# Altium PCB Membrane_Board_Latest.PcbDoc (part 1 of 4)
Units mil, origin at the board's own origin, x right, y up, seen from the top; angles counter-clockwise.
Board outline 11929.13 x 4962.8 mil, 2 copper layers (Top Layer, Bottom Layer), stack 59 mil thick; 247 components, 169 nets, 1256 pads, 657 vias.
Unrouted connection lines stored in the file: 293.
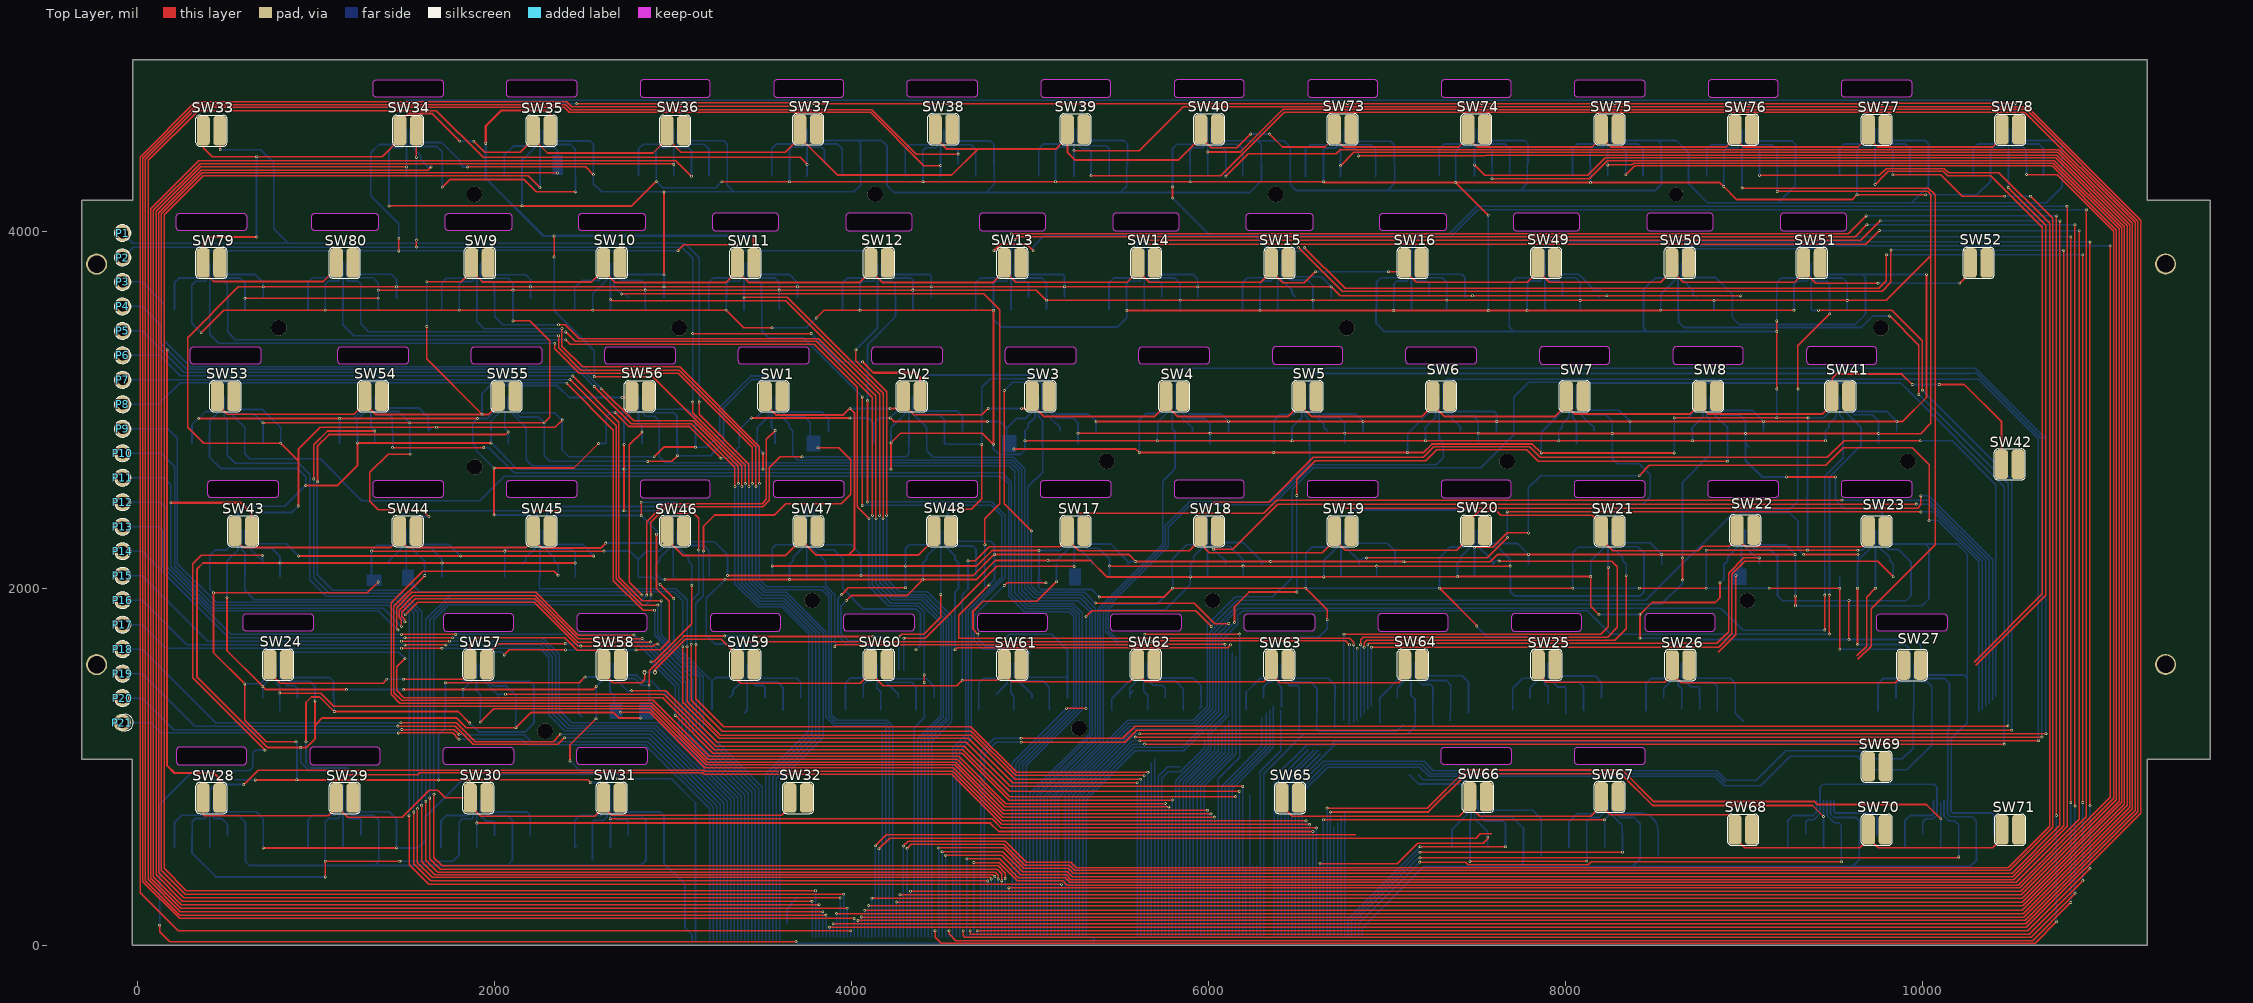
[diagram p0: Top Layer view]
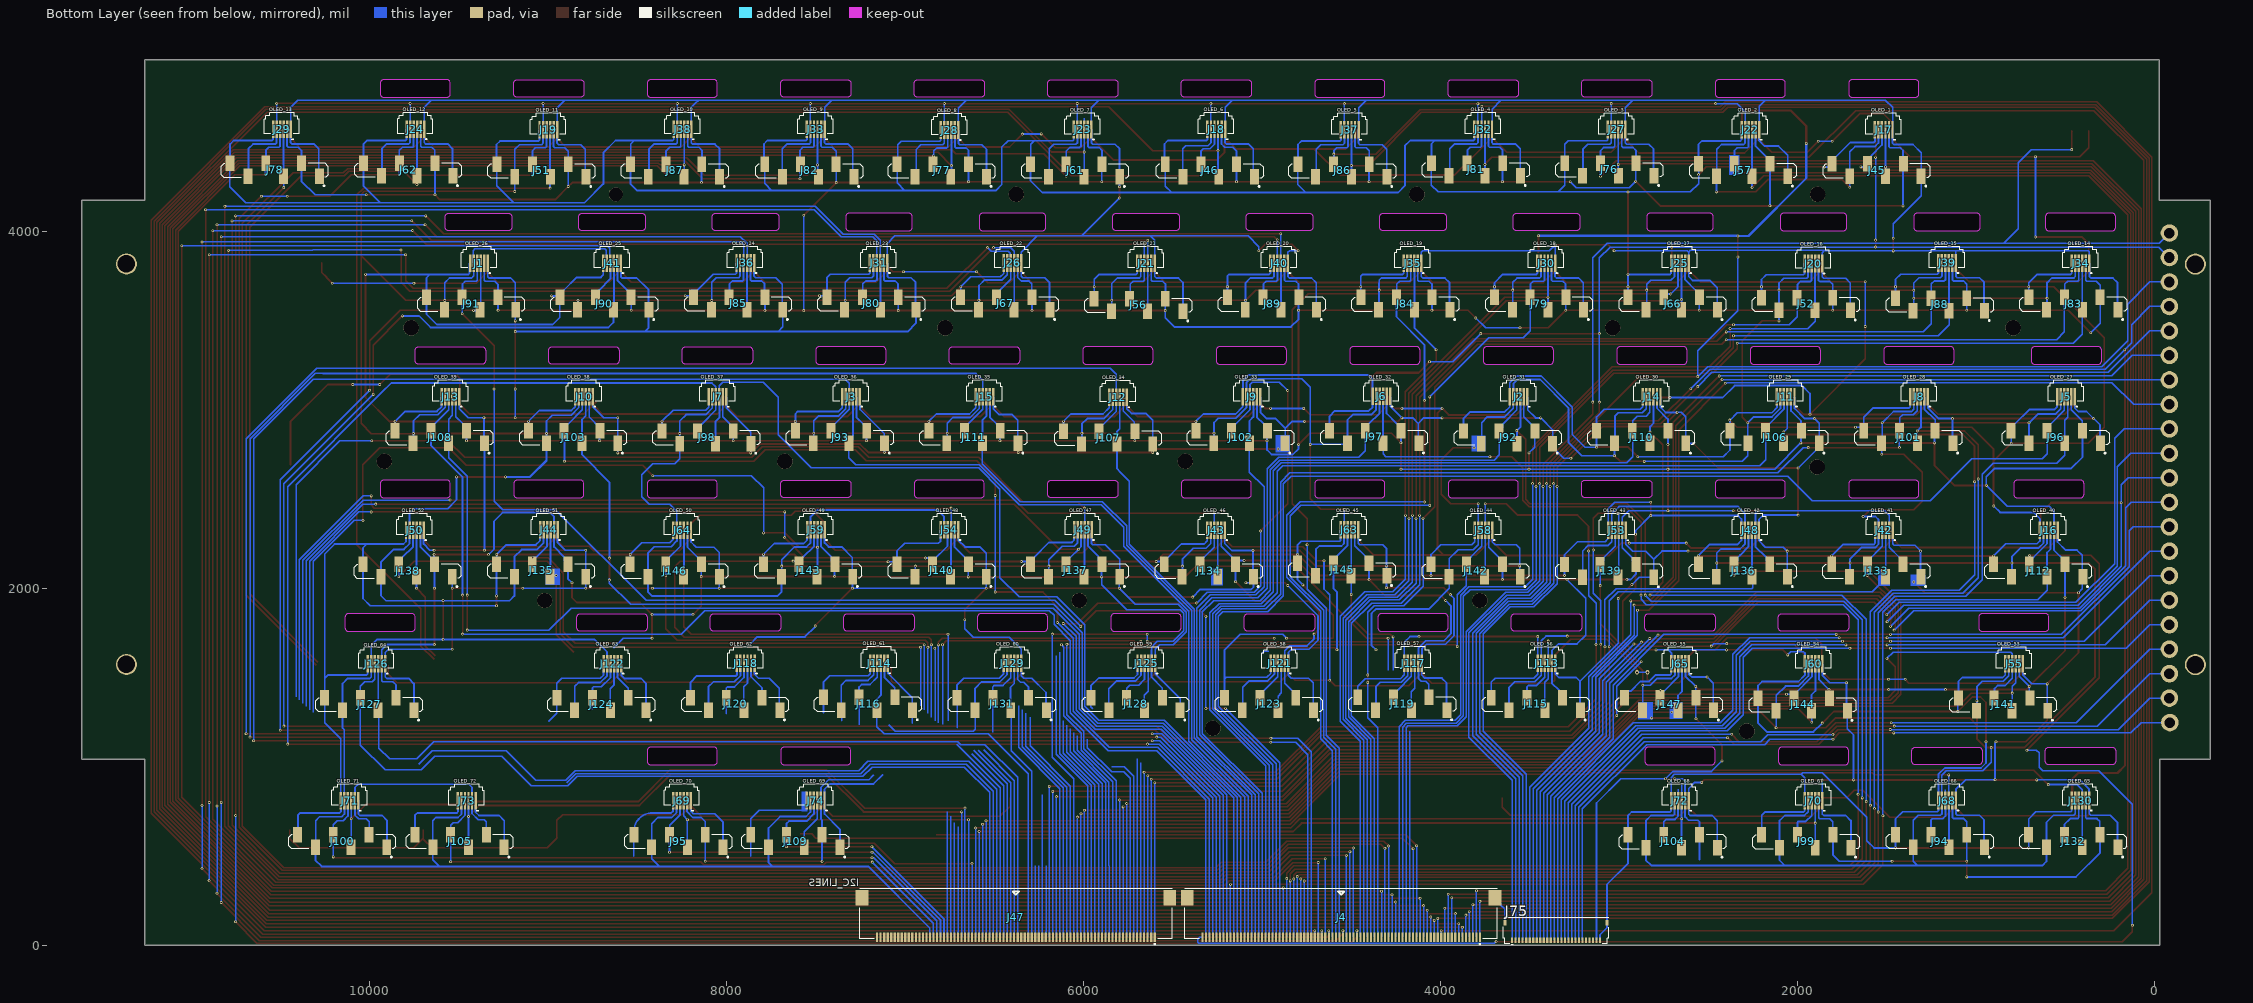
[diagram p1: Bottom Layer view, seen from below]
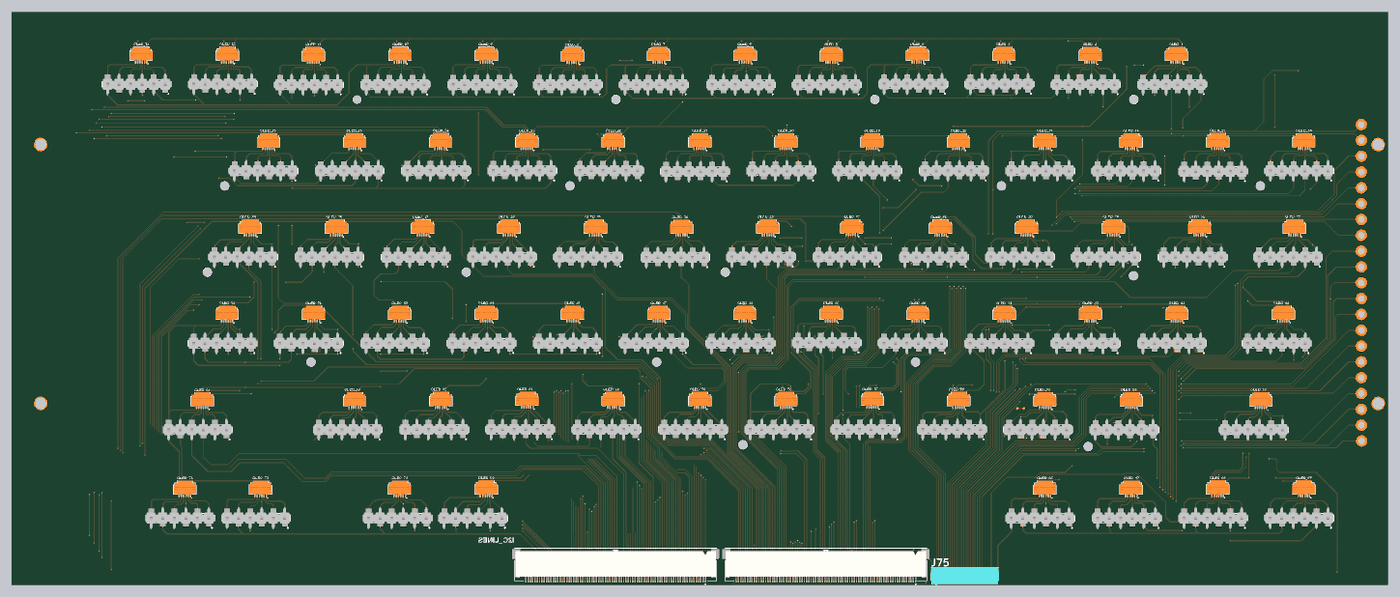
[diagram p5: 3D render of the assembled board from below, using the file's embedded part models]

## Layer stack, top to bottom
Top Solder: solder mask 2, Solder Resist, Dk 3.5
Top Layer: signal copper 12
Dielectric 1: dielectric 35, FR-4, Dk 4.8
Bottom Layer: signal copper 12
Bottom Solder: solder mask 2, Solder Resist, Dk 3.5

## Board outline
-314.96,1043.12 -314.96,4175.4 -29,4175.4 -29,4962.8 11260,4962.8 11260,4175.4 11614.17,4175.4 11614.17,1043.12 11260,1043.12 11260,0 -30,0 -30,1043.12
cut-out: 236.22,4003.16 cw(c236.22,4022.84) 216.54,4022.84 216.54,4081.9 cw(c236.22,4081.9) 236.22,4101.58 590.55,4101.58 cw(c590.55,4081.9) 610.24,4081.9 610.24,4022.84 cw(c590.55,4022.84) 590.55,4003.16
cut-out: 974.41,4022.84 974.41,4081.9 cw(c994.09,4081.9) 994.09,4101.58 1328.74,4101.58 cw(c1328.74,4081.9) 1348.43,4081.9 1348.43,4022.84 cw(c1328.74,4022.84) 1328.74,4003.16 994.09,4003.16 cw(c994.09,4022.84)
cut-out: 295.27,3274.81 295.27,3333.87 cw(c314.95,3333.87) 314.95,3353.55 669.28,3353.55 cw(c669.28,3333.87) 688.97,3333.87 688.97,3274.81 cw(c669.28,3274.81) 669.28,3255.13 314.95,3255.13 cw(c314.95,3274.81)
cut-out: 1122.05,3274.81 1122.05,3333.87 cw(c1141.73,3333.87) 1141.73,3353.55 1496.06,3353.55 cw(c1496.06,3333.87) 1515.75,3333.87 1515.75,3274.81 cw(c1496.06,3274.81) 1496.06,3255.13 1141.73,3255.13 cw(c1141.73,3274.81)
cut-out: 1318.9,2526.78 1318.9,2585.83 cw(c1338.58,2585.83) 1338.58,2605.52 1692.91,2605.52 cw(c1692.91,2585.83) 1712.6,2585.83 1712.6,2526.78 cw(c1692.91,2526.78) 1692.91,2507.09 1338.58,2507.09 cw(c1338.58,2526.78)
cut-out: 393.69,2526.78 393.69,2585.83 cw(c413.38,2585.83) 413.38,2605.52 767.71,2605.52 cw(c767.71,2585.83) 787.39,2585.83 787.39,2526.78 cw(c767.71,2526.78) 767.71,2507.09 413.38,2507.09 cw(c413.38,2526.78)
cut-out: 590.54,1778.75 590.54,1837.8 cw(c610.23,1837.8) 610.23,1857.49 964.56,1857.49 cw(c964.56,1837.8) 984.24,1837.8 984.24,1778.75 cw(c964.56,1778.75) 964.56,1759.06 610.23,1759.06 cw(c610.23,1778.75)
cut-out: 216.54,1030.72 ccw(c236.22,1030.72) 236.22,1011.03 590.55,1011.03 ccw(c590.55,1030.72) 610.24,1030.72 610.24,1089.77 ccw(c590.55,1089.77) 590.55,1109.46 236.22,1109.46 ccw(c236.22,1089.77) 216.54,1089.77
cut-out: 964.57,1030.72 ccw(c984.25,1030.72) 984.25,1011.03 1338.58,1011.03 ccw(c1338.58,1030.72) 1358.27,1030.72 1358.27,1089.77 ccw(c1338.58,1089.77) 1338.58,1109.46 984.25,1109.46 ccw(c984.25,1089.77) 964.57,1089.77
cut-out: 1712.6,1030.72 1712.6,1089.77 cw(c1732.28,1089.77) 1732.28,1109.46 2086.61,1109.46 cw(c2086.61,1089.77) 2106.3,1089.77 2106.3,1030.72 cw(c2086.61,1030.72) 2086.61,1011.03 1732.28,1011.03 cw(c1732.28,1030.72)
cut-out: 2460.63,1030.72 2460.63,1089.77 cw(c2480.31,1089.77) 2480.31,1109.46 2834.65,1109.46 cw(c2834.65,1089.77) 2854.33,1089.77 2854.33,1030.72 cw(c2834.65,1030.72) 2834.65,1011.03 2480.31,1011.03 cw(c2480.31,1030.72)
cut-out: 3966.54,4022.84 ccw(c3986.22,4022.84) 3986.22,4003.16 4320.87,4003.16 ccw(c4320.87,4022.84) 4340.55,4022.84 4340.55,4081.9 ccw(c4320.87,4081.9) 4320.87,4101.58 3986.22,4101.58 ccw(c3986.22,4081.9) 3966.54,4081.9
cut-out: 3218.5,4022.84 ccw(c3238.19,4022.84) 3238.19,4003.16 3572.83,4003.16 ccw(c3572.83,4022.84) 3592.52,4022.84 3592.52,4081.9 ccw(c3572.83,4081.9) 3572.83,4101.58 3238.19,4101.58 ccw(c3238.19,4081.9) 3218.5,4081.9
cut-out: 2470.47,4022.84 2470.47,4081.9 cw(c2490.16,4081.9) 2490.16,4101.58 2824.8,4101.58 cw(c2824.8,4081.9) 2844.49,4081.9 2844.49,4022.84 cw(c2824.8,4022.84) 2824.8,4003.16 2490.16,4003.16 cw(c2490.16,4022.84)
cut-out: 1722.44,4022.84 1722.44,4081.9 cw(c1742.13,4081.9) 1742.13,4101.58 2076.77,4101.58 cw(c2076.77,4081.9) 2096.46,4081.9 2096.46,4022.84 cw(c2076.77,4022.84) 2076.77,4003.16 1742.13,4003.16 cw(c1742.13,4022.84)
cut-out: 1870.08,3274.81 1870.08,3333.87 cw(c1889.76,3333.87) 1889.76,3353.55 2244.09,3353.55 cw(c2244.09,3333.87) 2263.78,3333.87 2263.78,3274.81 cw(c2244.09,3274.81) 2244.09,3255.13 1889.76,3255.13 cw(c1889.76,3274.81)
cut-out: 2618.11,3274.81 2618.11,3333.87 cw(c2637.8,3333.87) 2637.8,3353.55 2992.13,3353.55 cw(c2992.13,3333.87) 3011.81,3333.87 3011.81,3274.81 cw(c2992.13,3274.81) 2992.13,3255.13 2637.8,3255.13 cw(c2637.8,3274.81)
cut-out: 2066.93,2526.78 2066.93,2585.83 cw(c2086.61,2585.83) 2086.61,2605.52 2440.94,2605.52 cw(c2440.94,2585.83) 2460.63,2585.83 2460.63,2526.78 cw(c2440.94,2526.78) 2440.94,2507.09 2086.61,2507.09 cw(c2086.61,2526.78)
cut-out: 1712.6,1778.75 ccw(c1732.28,1778.75) 1732.28,1759.06 2086.61,1759.06 ccw(c2086.61,1778.75) 2106.3,1778.75 2106.3,1837.8 ccw(c2086.61,1837.8) 2086.61,1857.49 1732.28,1857.49 ccw(c1732.28,1837.8) 1712.6,1837.8
cut-out: 2460.63,1778.75 ccw(c2480.31,1778.75) 2480.31,1759.06 2834.65,1759.06 ccw(c2834.65,1778.75) 2854.33,1778.75 2854.33,1837.8 ccw(c2834.65,1837.8) 2834.65,1857.49 2480.31,1857.49 ccw(c2480.31,1837.8) 2460.63,1837.8
cut-out: 2814.96,2526.78 ccw(c2834.65,2526.78) 2834.65,2507.09 3188.98,2507.09 ccw(c3188.98,2526.78) 3208.66,2526.78 3208.66,2585.83 ccw(c3188.98,2585.83) 3188.98,2605.52 2834.65,2605.52 ccw(c2834.65,2585.83) 2814.96,2585.83
cut-out: 3208.66,1778.75 ccw(c3228.35,1778.75) 3228.35,1759.06 3582.68,1759.06 ccw(c3582.68,1778.75) 3602.36,1778.75 3602.36,1837.8 ccw(c3582.68,1837.8) 3582.68,1857.49 3228.35,1857.49 ccw(c3228.35,1837.8) 3208.66,1837.8
cut-out: 3956.69,1778.75 3956.69,1837.8 cw(c3976.38,1837.8) 3976.38,1857.49 4330.71,1857.49 cw(c4330.71,1837.8) 4350.39,1837.8 4350.39,1778.75 cw(c4330.71,1778.75) 4330.71,1759.06 3976.38,1759.06 cw(c3976.38,1778.75)
cut-out: 3562.99,2526.78 3562.99,2585.83 cw(c3582.68,2585.83) 3582.68,2605.52 3937.01,2605.52 cw(c3937.01,2585.83) 3956.69,2585.83 3956.69,2526.78 cw(c3937.01,2526.78) 3937.01,2507.09 3582.68,2507.09 cw(c3582.68,2526.78)
cut-out: 3366.14,3274.81 3366.14,3333.87 cw(c3385.83,3333.87) 3385.83,3353.55 3740.16,3353.55 cw(c3740.16,3333.87) 3759.84,3333.87 3759.84,3274.81 cw(c3740.16,3274.81) 3740.16,3255.13 3385.83,3255.13 cw(c3385.83,3274.81)
cut-out: 4114.17,3274.81 4114.17,3333.87 cw(c4133.86,3333.87) 4133.86,3353.55 4488.19,3353.55 cw(c4488.19,3333.87) 4507.87,3333.87 4507.87,3274.81 cw(c4488.19,3274.81) 4488.19,3255.13 4133.86,3255.13 cw(c4133.86,3274.81)
cut-out: 4311.02,2526.78 4311.02,2585.83 cw(c4330.71,2585.83) 4330.71,2605.52 4685.04,2605.52 cw(c4685.04,2585.83) 4704.72,2585.83 4704.72,2526.78 cw(c4685.04,2526.78) 4685.04,2507.09 4330.71,2507.09 cw(c4330.71,2526.78)
cut-out: 4714.57,4022.84 ccw(c4734.25,4022.84) 4734.25,4003.16 5068.9,4003.16 ccw(c5068.9,4022.84) 5088.58,4022.84 5088.58,4081.9 ccw(c5068.9,4081.9) 5068.9,4101.58 4734.25,4101.58 ccw(c4734.25,4081.9) 4714.57,4081.9
cut-out: 5462.6,4022.84 ccw(c5482.28,4022.84) 5482.28,4003.16 5816.93,4003.16 ccw(c5816.93,4022.84) 5836.61,4022.84 5836.61,4081.9 ccw(c5816.93,4081.9) 5816.93,4101.58 5482.28,4101.58 ccw(c5482.28,4081.9) 5462.6,4081.9
cut-out: 4862.2,3274.81 4862.2,3333.87 cw(c4881.89,3333.87) 4881.89,3353.55 5236.22,3353.55 cw(c5236.22,3333.87) 5255.91,3333.87 5255.91,3274.81 cw(c5236.22,3274.81) 5236.22,3255.13 4881.89,3255.13 cw(c4881.89,3274.81)
cut-out: 5610.24,3274.81 5610.24,3333.87 cw(c5629.92,3333.87) 5629.92,3353.55 5984.25,3353.55 cw(c5984.25,3333.87) 6003.94,3333.87 6003.94,3274.81 cw(c5984.25,3274.81) 5984.25,3255.13 5629.92,3255.13 cw(c5629.92,3274.81)
cut-out: 5059.06,2526.78 5059.06,2585.83 cw(c5078.74,2585.83) 5078.74,2605.52 5433.07,2605.52 cw(c5433.07,2585.83) 5452.76,2585.83 5452.76,2526.78 cw(c5433.07,2526.78) 5433.07,2507.09 5078.74,2507.09 cw(c5078.74,2526.78)
cut-out: 5807.09,2526.78 ccw(c5826.77,2526.78) 5826.77,2507.09 6181.1,2507.09 ccw(c6181.1,2526.78) 6200.79,2526.78 6200.79,2585.83 ccw(c6181.1,2585.83) 6181.1,2605.52 5826.77,2605.52 ccw(c5826.77,2585.83) 5807.09,2585.83
cut-out: 4704.72,1778.75 ccw(c4724.41,1778.75) 4724.41,1759.06 5078.74,1759.06 ccw(c5078.74,1778.75) 5098.43,1778.75 5098.43,1837.8 ccw(c5078.74,1837.8) 5078.74,1857.49 4724.41,1857.49 ccw(c4724.41,1837.8) 4704.72,1837.8
cut-out: 5452.76,1778.75 5452.76,1837.8 cw(c5472.44,1837.8) 5472.44,1857.49 5826.77,1857.49 cw(c5826.77,1837.8) 5846.46,1837.8 5846.46,1778.75 cw(c5826.77,1778.75) 5826.77,1759.06 5472.44,1759.06 cw(c5472.44,1778.75)
cut-out: 6200.79,1778.75 6200.79,1837.8 cw(c6220.47,1837.8) 6220.47,1857.49 6574.8,1857.49 cw(c6574.8,1837.8) 6594.49,1837.8 6594.49,1778.75 cw(c6574.8,1778.75) 6574.8,1759.06 6220.47,1759.06 cw(c6220.47,1778.75)
cut-out: 6210.63,4022.84 6210.63,4081.9 cw(c6230.31,4081.9) 6230.31,4101.58 6564.96,4101.58 cw(c6564.96,4081.9) 6584.65,4081.9 6584.65,4022.84 cw(c6564.96,4022.84) 6564.96,4003.16 6230.31,4003.16 cw(c6230.31,4022.84)
cut-out: 6958.66,4022.84 6958.66,4081.9 cw(c6978.35,4081.9) 6978.35,4101.58 7312.99,4101.58 cw(c7312.99,4081.9) 7332.68,4081.9 7332.68,4022.84 cw(c7312.99,4022.84) 7312.99,4003.16 6978.35,4003.16 cw(c6978.35,4022.84)
cut-out: 7106.3,3274.81 7106.3,3333.87 cw(c7125.98,3333.87) 7125.98,3353.55 7480.32,3353.55 cw(c7480.31,3333.87) 7500,3333.87 7500,3274.81 cw(c7480.32,3274.81) 7480.32,3255.13 7125.98,3255.13 cw(c7125.98,3274.81)
cut-out: 6358.27,3274.81 ccw(c6377.95,3274.81) 6377.95,3255.13 6732.28,3255.13 ccw(c6732.28,3274.81) 6751.97,3274.81 6751.97,3333.87 ccw(c6732.28,3333.87) 6732.28,3353.55 6377.95,3353.55 ccw(c6377.95,3333.87) 6358.27,3333.87
cut-out: 6555.12,2526.78 6555.12,2585.83 cw(c6574.8,2585.83) 6574.8,2605.52 6929.13,2605.52 cw(c6929.13,2585.83) 6948.82,2585.83 6948.82,2526.78 cw(c6929.13,2526.78) 6929.13,2507.09 6574.8,2507.09 cw(c6574.8,2526.78)
cut-out: 7303.15,2526.78 ccw(c7322.83,2526.78) 7322.83,2507.09 7677.17,2507.09 ccw(c7677.17,2526.78) 7696.85,2526.78 7696.85,2585.83 ccw(c7677.17,2585.83) 7677.17,2605.52 7322.83,2605.52 ccw(c7322.83,2585.83) 7303.15,2585.83
cut-out: 8051.18,2526.78 8051.18,2585.83 cw(c8070.87,2585.83) 8070.87,2605.52 8425.2,2605.52 cw(c8425.2,2585.83) 8444.88,2585.83 8444.88,2526.78 cw(c8425.2,2526.78) 8425.2,2507.09 8070.87,2507.09 cw(c8070.87,2526.78)
cut-out: 7854.33,3274.81 ccw(c7874.02,3274.81) 7874.02,3255.13 8228.35,3255.13 ccw(c8228.35,3274.81) 8248.03,3274.81 8248.03,3333.87 ccw(c8228.35,3333.87) 8228.35,3353.55 7874.02,3353.55 ccw(c7874.02,3333.87) 7854.33,3333.87
cut-out: 7706.69,4022.84 ccw(c7726.38,4022.84) 7726.38,4003.16 8061.02,4003.16 ccw(c8061.02,4022.84) 8080.71,4022.84 8080.71,4081.9 ccw(c8061.02,4081.9) 8061.02,4101.58 7726.38,4101.58 ccw(c7726.38,4081.9) 7706.69,4081.9
cut-out: 6948.82,1778.75 ccw(c6968.5,1778.75) 6968.5,1759.06 7322.83,1759.06 ccw(c7322.83,1778.75) 7342.52,1778.75 7342.52,1837.8 ccw(c7322.83,1837.8) 7322.83,1857.49 6968.5,1857.49 ccw(c6968.5,1837.8) 6948.82,1837.8
cut-out: 7696.85,1778.75 ccw(c7716.54,1778.75) 7716.54,1759.06 8070.87,1759.06 ccw(c8070.87,1778.75) 8090.55,1778.75 8090.55,1837.8 ccw(c8070.87,1837.8) 8070.87,1857.49 7716.54,1857.49 ccw(c7716.54,1837.8) 7696.85,1837.8
cut-out: 7303.15,1030.72 7303.15,1089.77 cw(c7322.83,1089.77) 7322.83,1109.46 7677.17,1109.46 cw(c7677.17,1089.77) 7696.85,1089.77 7696.85,1030.72 cw(c7677.17,1030.72) 7677.17,1011.03 7322.83,1011.03 cw(c7322.83,1030.72)
cut-out: 8051.18,1030.72 8051.18,1089.77 cw(c8070.87,1089.77) 8070.87,1109.46 8425.2,1109.46 cw(c8425.2,1089.77) 8444.88,1089.77 8444.88,1030.72 cw(c8425.2,1030.72) 8425.2,1011.03 8070.87,1011.03 cw(c8070.87,1030.72)
cut-out: 8444.88,1778.75 ccw(c8464.57,1778.75) 8464.57,1759.06 8818.9,1759.06 ccw(c8818.9,1778.75) 8838.58,1778.75 8838.58,1837.8 ccw(c8818.9,1837.8) 8818.9,1857.49 8464.57,1857.49 ccw(c8464.57,1837.8) 8444.88,1837.8
cut-out: 9744.09,1778.75 9744.09,1837.8 cw(c9763.77,1837.8) 9763.77,1857.49 10118.1,1857.49 cw(c10118.1,1837.8) 10137.79,1837.8 10137.79,1778.75 cw(c10118.1,1778.75) 10118.1,1759.06 9763.77,1759.06 cw(c9763.77,1778.75)
cut-out: 8799.21,2526.78 8799.21,2585.83 cw(c8818.9,2585.83) 8818.9,2605.52 9173.23,2605.52 cw(c9173.23,2585.83) 9192.91,2585.83 9192.91,2526.78 cw(c9173.23,2526.78) 9173.23,2507.09 8818.9,2507.09 cw(c8818.9,2526.78)
cut-out: 9547.24,2526.78 9547.24,2585.83 cw(c9566.93,2585.83) 9566.93,2605.52 9921.26,2605.52 cw(c9921.26,2585.83) 9940.94,2585.83 9940.94,2526.78 cw(c9921.26,2526.78) 9921.26,2507.09 9566.93,2507.09 cw(c9566.93,2526.78)
cut-out: 8602.36,3274.81 ccw(c8622.05,3274.81) 8622.05,3255.13 8976.38,3255.13 ccw(c8976.38,3274.81) 8996.06,3274.81 8996.06,3333.87 ccw(c8976.38,3333.87) 8976.38,3353.55 8622.05,3353.55 ccw(c8622.05,3333.87) 8602.36,3333.87
cut-out: 8454.72,4022.84 ccw(c8474.41,4022.84) 8474.41,4003.16 8809.06,4003.16 ccw(c8809.06,4022.84) 8828.74,4022.84 8828.74,4081.9 ccw(c8809.06,4081.9) 8809.06,4101.58 8474.41,4101.58 ccw(c8474.41,4081.9) 8454.72,4081.9
cut-out: 9350.39,3274.81 ccw(c9370.08,3274.81) 9370.08,3255.13 9724.41,3255.13 ccw(c9724.41,3274.81) 9744.09,3274.81 9744.09,3333.87 ccw(c9724.41,3333.87) 9724.41,3353.55 9370.08,3353.55 ccw(c9370.08,3333.87) 9350.39,3333.87
cut-out: 9202.76,4022.84 ccw(c9222.44,4022.84) 9222.44,4003.16 9557.09,4003.16 ccw(c9557.09,4022.84) 9576.77,4022.84 9576.77,4081.9 ccw(c9557.09,4081.9) 9557.09,4101.58 9222.44,4101.58 ccw(c9222.44,4081.9) 9202.76,4081.9
cut-out: 9547.24,4770.87 9547.24,4829.93 cw(c9566.93,4829.93) 9566.93,4849.61 9921.26,4849.61 cw(c9921.26,4829.93) 9940.94,4829.93 9940.94,4770.87 cw(c9921.26,4770.87) 9921.26,4751.19 9566.93,4751.19 cw(c9566.93,4770.87)
cut-out: 8799.21,4770.87 ccw(c8818.9,4770.87) 8818.9,4751.19 9173.23,4751.19 ccw(c9173.23,4770.87) 9192.91,4770.87 9192.91,4829.93 ccw(c9173.23,4829.93) 9173.23,4849.61 8818.9,4849.61 ccw(c8818.9,4829.93) 8799.21,4829.93
cut-out: 8051.18,4770.87 8051.18,4829.93 cw(c8070.87,4829.93) 8070.87,4849.61 8425.2,4849.61 cw(c8425.2,4829.93) 8444.88,4829.93 8444.88,4770.87 cw(c8425.2,4770.87) 8425.2,4751.19 8070.87,4751.19 cw(c8070.87,4770.87)
cut-out: 7303.15,4770.87 ccw(c7322.83,4770.87) 7322.83,4751.19 7677.17,4751.19 ccw(c7677.17,4770.87) 7696.85,4770.87 7696.85,4829.93 ccw(c7677.17,4829.93) 7677.17,4849.61 7322.83,4849.61 ccw(c7322.83,4829.93) 7303.15,4829.93
cut-out: 6555.12,4770.87 ccw(c6574.8,4770.87) 6574.8,4751.19 6929.13,4751.19 ccw(c6929.13,4770.87) 6948.82,4770.87 6948.82,4829.93 ccw(c6929.13,4829.93) 6929.13,4849.61 6574.8,4849.61 ccw(c6574.8,4829.93) 6555.12,4829.93
cut-out: 5826.77,4751.19 6181.1,4751.19 ccw(c6181.1,4770.87) 6200.79,4770.87 6200.79,4829.93 ccw(c6181.1,4829.93) 6181.1,4849.61 5826.77,4849.61 ccw(c5826.77,4829.93) 5807.09,4829.93 5807.09,4770.87 ccw(c5826.77,4770.87)
cut-out: 5826.77,4751.19 6181.1,4751.19 ccw(c6181.1,4770.87) 6200.79,4770.87 6200.79,4829.93 ccw(c6181.1,4829.93) 6181.1,4849.61 5826.77,4849.61 ccw(c5826.77,4829.93) 5807.09,4829.93 5807.09,4770.87 ccw(c5826.77,4770.87)
cut-out: 5078.74,4751.19 5433.07,4751.19 ccw(c5433.07,4770.87) 5452.76,4770.87 5452.76,4829.93 ccw(c5433.07,4829.93) 5433.07,4849.61 5078.74,4849.61 ccw(c5078.74,4829.93) 5059.06,4829.93 5059.06,4770.87 ccw(c5078.74,4770.87)
cut-out: 4311.02,4770.87 4311.02,4829.93 cw(c4330.71,4829.93) 4330.71,4849.61 4685.04,4849.61 cw(c4685.04,4829.93) 4704.72,4829.93 4704.72,4770.87 cw(c4685.04,4770.87) 4685.04,4751.19 4330.71,4751.19 cw(c4330.71,4770.87)
cut-out: 3582.68,4751.19 3937.01,4751.19 ccw(c3937.01,4770.87) 3956.69,4770.87 3956.69,4829.93 ccw(c3937.01,4829.93) 3937.01,4849.61 3582.68,4849.61 ccw(c3582.68,4829.93) 3562.99,4829.93 3562.99,4770.87 ccw(c3582.68,4770.87)
cut-out: 2834.65,4751.19 3188.98,4751.19 ccw(c3188.98,4770.87) 3208.66,4770.87 3208.66,4829.93 ccw(c3188.98,4829.93) 3188.98,4849.61 2834.65,4849.61 ccw(c2834.65,4829.93) 2814.96,4829.93 2814.96,4770.87 ccw(c2834.65,4770.87)
cut-out: 2066.93,4770.87 2066.93,4829.93 cw(c2086.61,4829.93) 2086.61,4849.61 2440.94,4849.61 cw(c2440.94,4829.93) 2460.63,4829.93 2460.63,4770.87 cw(c2440.94,4770.87) 2440.94,4751.19 2086.61,4751.19 cw(c2086.61,4770.87)
cut-out: 1338.58,4751.19 cw(c1338.58,4770.87) 1318.9,4770.87 1318.9,4829.93 cw(c1338.58,4829.93) 1338.58,4849.61 1692.91,4849.61 cw(c1692.91,4829.93) 1712.6,4829.93 1712.6,4770.87 cw(c1692.91,4770.87) 1692.91,4751.19

## Design rules (kind name [scope] priority, off if disabled: settings)
Clearance [All] p1: gap=7 ignorepadtopadclearanceinfootprint=FALSE except(4: Arc-SMDPad Track-SMDPad SMDPad-SMDPad)
ComponentClearance [All] p1: gap=0 collisioncheckmode=3 verticalgap=0 showdistances=FALSE
HoleSize [All] p1: absolutevalues=TRUE maxlimit=1000 minlimit=1 maxpercent=80.000 minpercent=20.000
HoleToHoleClearance [All] p1: gap=0 allowstackedmicrovias=TRUE
MinimumSolderMaskSliver [All] p1: minsoldermaskwidth=0
PolygonConnect [All] p1: connectstyle=Relief reliefconductorwidth=10 reliefentries=4 polygonreliefangle="90 Angle" airgapwidth=10
RoutingVias [All] p1: holewidth=11.81 width=23.62 viastyle="Through Hole" minholewidth=7.87 minwidth=15.75 maxholewidth=11.81 maxwidth=23.62
SilkToSilkClearance [All] p1: silktosilkclearance=0
SilkToSolderMaskClearance [IsPad] p1: minsilkscreentomaskgap=0 clearancetoexposedcopper=TRUE
SolderMaskExpansion [All] p1: expansion=4 istentingtop=FALSE
Width [All] p1: maxlimit=50 minlimit=8 preferedwidth=8 minimp=50.000000 maximp=50.000000 favimp=50.000000
24 further rules are at their usual default settings.

## Classes and differential pairs
component class U_Button_Sheet_2: SW41 SW42 SW43 SW44 SW45 SW46 SW47 SW48 SW49 SW50 SW51 SW52 SW53 SW54 SW55 SW56 SW57 SW58 SW59 SW60 SW61 SW62 SW63 SW64 SW65 SW66 SW67 SW68 SW69 SW70 SW71 SW73 SW74 SW75 SW76 SW77 SW78 SW79 SW80
component class U_Button_Sheet_1: SW1 SW2 SW3 SW4 SW5 SW6 SW7 SW8 SW9 SW10 SW11 SW12 SW13 SW14 SW15 SW16 SW17 SW18 SW19 SW20 SW21 SW22 SW23 SW24 SW25 SW26 SW27 SW28 SW29 SW30 SW31 SW32 SW33 SW34 SW35 SW36 SW37 SW38 SW39 SW40
component class U_Header_Sheet_4: J133 J134 J135 J136 J137 J138 J139 J140 J141 J142 J143 J144 J145 J146 J147
component class U_Header_Sheet_3: J113 J114 J115 J116 J117 J118 J119 J120 J121 J122 J123 J124 J125 J126 J127 J128 J129 J130 J131 J132 S
component class U_Header_Sheet_2: J91 J92 J93 J94 J95 J96 J97 J98 J99 J100 J101 J102 J103 J104 J105 J106 J107 J108 J109 J110 J111 J112
component class U_Header_Sheet_1: J45 J46 J51 J52 J56 J57 J61 J62 J66 J67 J76 J77 J78 J79 J80 J81 J82 J83 J84 J85 J86 J87 J88 J89 J90
component class U_Controller_Sheet_5: J75 P1 P2 P3 P4 P5 P6 P7 P8 P9 P10 P11 P12 P13 P14 P15 P16 P17 P18 P19 P20 P21
component class U_Connector_Sheet_4: J68 J69 J70 J71 J72 J73 J74
component class U_Connector_Sheet_3: J42 J43 J44 J47 J48 J49 J50 J53 J54 J55 J58 J59 J60 J63 J64 J65
component class U_Connector_Sheet_2: J17 J18 J19 J20 J21 J22 J23 J24 J25 J26 J27 J28 J29 J30 J31 J32 J33 J34 J35 J36 J37 J38 J39 J40 J41
component class U_Connector_Sheet_1: J1 J2 J3 J4 J5 J6 J7 J8 J9 J10 J11 J12 J13 J14 J15 J16

## Components (designator, comment, footprint, x,y, rotation, side; value= is the part's Value field where it differs from the comment)
J1 "FH19C-6S-0.5SH(10)" FH19C-6S-0.5SH(10) 9337.73,3821.75 r0 bottom locked
J2 "FH19C-6S-0.5SH(10)" FH19C-6S-0.5SH(10) 3512.73,3072.75 r0 bottom locked
J3 "FH19C-6S-0.5SH(10)" FH19C-6S-0.5SH(10) 7252.79,3073.75 r0 bottom
J4 "046288080000846+" 046288080000846+ 4556.35,155.68 r0 bottom locked
J5 "FH19C-6S-0.5SH(10)" FH19C-6S-0.5SH(10) 445.36,3073.75 r0 bottom locked
J6 "FH19C-6S-0.5SH(10)" FH19C-6S-0.5SH(10) 4281.73,3074.75 r0 bottom locked
J7 "FH19C-6S-0.5SH(10)" FH19C-6S-0.5SH(10) 8000.79,3072.75 r0 bottom locked
J8 "FH19C-6S-0.5SH(10)" FH19C-6S-0.5SH(10) 1268.42,3073.75 r0 bottom locked
J9 "FH19C-6S-0.5SH(10)" FH19C-6S-0.5SH(10) 5008.42,3073.75 r0 bottom
J10 "FH19C-6S-0.5SH(10)" FH19C-6S-0.5SH(10) 8749.1,3073.75 r0 bottom locked
J11 "FH19C-6S-0.5SH(10)" FH19C-6S-0.5SH(10) 2016.05,3073.75 r0 bottom locked
J12 "FH19C-6S-0.5SH(10)" FH19C-6S-0.5SH(10) 5757.42,3070.75 r0 bottom locked
J13 "FH19C-6S-0.5SH(10)" FH19C-6S-0.5SH(10) 9497.42,3073.75 r0 bottom locked
J14 "FH19C-6S-0.5SH(10)" FH19C-6S-0.5SH(10) 2766.73,3073.75 r0 bottom locked
J15 "FH19C-6S-0.5SH(10)" FH19C-6S-0.5SH(10) 6504.73,3073.75 r0 bottom locked
J16 "FH19C-6S-0.5SH(10)" FH19C-6S-0.5SH(10) 542.05,2325.75 r0 bottom locked
J17 "FH19C-6S-0.5SH(10)" FH19C-6S-0.5SH(10) 1466.79,4569.75 r0 bottom locked
J18 "FH19C-6S-0.5SH(10)" FH19C-6S-0.5SH(10) 5206.73,4571.75 r0 bottom locked
J19 "FH19C-6S-0.5SH(10)" FH19C-6S-0.5SH(10) 8949.42,4568.75 r0 bottom locked
J20 "FH19C-6S-0.5SH(10)" FH19C-6S-0.5SH(10) 1861.05,3819.75 r0 bottom locked
J21 "FH19C-6S-0.5SH(10)" FH19C-6S-0.5SH(10) 5600.05,3821.75 r0 bottom locked
J22 "FH19C-6S-0.5SH(10)" FH19C-6S-0.5SH(10) 2214.36,4569.75 r0 bottom locked
J23 "FH19C-6S-0.5SH(10)" FH19C-6S-0.5SH(10) 5955.42,4570.75 r0 bottom locked
J24 "FH19C-6S-0.5SH(10)" FH19C-6S-0.5SH(10) 9694.1,4572.75 r0 bottom locked
J25 "FH19C-6S-0.5SH(10)" FH19C-6S-0.5SH(10) 2609.05,3821.75 r0 bottom locked
J26 "FH19C-6S-0.5SH(10)" FH19C-6S-0.5SH(10) 6348.73,3822.75 r0 bottom locked
J27 "FH19C-6S-0.5SH(10)" FH19C-6S-0.5SH(10) 2963.79,4570.75 r0 bottom locked
J28 "FH19C-6S-0.5SH(10)" FH19C-6S-0.5SH(10) 6700.79,4567.75 r0 bottom locked
J29 "FH19C-6S-0.5SH(10)" FH19C-6S-0.5SH(10) 10442.42,4571.75 r0 bottom locked
J30 "FH19C-6S-0.5SH(10)" FH19C-6S-0.5SH(10) 3357.73,3821.75 r0 bottom locked
J31 "FH19C-6S-0.5SH(10)" FH19C-6S-0.5SH(10) 7098.42,3822.75 r0 bottom locked
J32 "FH19C-6S-0.5SH(10)" FH19C-6S-0.5SH(10) 3710.79,4571.75 r0 bottom locked
J33 "FH19C-6S-0.5SH(10)" FH19C-6S-0.5SH(10) 7450.79,4571.75 r0 bottom locked
J34 "FH19C-6S-0.5SH(10)" FH19C-6S-0.5SH(10) 363.73,3821.75 r0 bottom locked
J35 "FH19C-6S-0.5SH(10)" FH19C-6S-0.5SH(10) 4106.73,3821.75 r0 bottom locked
J36 "FH19C-6S-0.5SH(10)" FH19C-6S-0.5SH(10) 7845.73,3822.75 r0 bottom locked
J37 "FH19C-6S-0.5SH(10)" FH19C-6S-0.5SH(10) 4458.79,4568.75 r0 bottom locked
J38 "FH19C-6S-0.5SH(10)" FH19C-6S-0.5SH(10) 8197.05,4571.75 r0 bottom locked
J39 "FH19C-6S-0.5SH(10)" FH19C-6S-0.5SH(10) 1111.36,3822.75 r0 bottom locked
J40 "FH19C-6S-0.5SH(10)" FH19C-6S-0.5SH(10) 4854.1,3821.75 r0 bottom locked
J41 "FH19C-6S-0.5SH(10)" FH19C-6S-0.5SH(10) 8591.73,3821.75 r0 bottom locked
J42 "FH19C-6S-0.5SH(10)" FH19C-6S-0.5SH(10) 1465.73,2325.75 r0 bottom locked
J43 "FH19C-6S-0.5SH(10)" FH19C-6S-0.5SH(10) 5208.05,2325.75 r0 bottom locked
J44 "FH19C-6S-0.5SH(10)" FH19C-6S-0.5SH(10) 8946.36,2326.75 r0 bottom locked
J45 "X6511WVS-06H-C60D48R2" X6511WVS-06H-C60D48R2 1306.16,4307.38 r0 bottom locked
J46 "X6511WVS-06H-C60D48R2" X6511WVS-06H-C60D48R2 5041.79,4305.75 r0 bottom locked
J47 "046288080000846+" 046288080000846+ 6378.35,155.68 r0 bottom locked
J48 "FH19C-6S-0.5SH(10)" FH19C-6S-0.5SH(10) 2215.05,2325.75 r0 bottom locked
J49 "FH19C-6S-0.5SH(10)" FH19C-6S-0.5SH(10) 5954.42,2326.75 r0 bottom locked
J50 "FH19C-6S-0.5SH(10)" FH19C-6S-0.5SH(10) 9697.42,2325.75 r0 bottom locked
J51 "X6511WVS-06H-C60D48R2" X6511WVS-06H-C60D48R2 8786.79,4305.75 r0 bottom locked
J52 "X6511WVS-06H-C60D48R2" X6511WVS-06H-C60D48R2 1701.79,3557.75 r0 bottom locked
J53 "FH19C-6S-0.5SH(10)" FH19C-6S-0.5SH(10) 2961.42,2324.75 r0 bottom locked
J54 "FH19C-6S-0.5SH(10)" FH19C-6S-0.5SH(10) 6702.36,2326.75 r0 bottom locked
J55 "FH19C-6S-0.5SH(10)" FH19C-6S-0.5SH(10) 736.73,1576.75 r0 bottom locked
J56 "X6511WVS-06H-C60D48R2" X6511WVS-06H-C60D48R2 5441.79,3552.46 r0 bottom locked
J57 "X6511WVS-06H-C60D48R2" X6511WVS-06H-C60D48R2 2053.73,4307.38 r0 bottom locked
J58 "FH19C-6S-0.5SH(10)" FH19C-6S-0.5SH(10) 3709.42,2325.75 r0 bottom locked
J59 "FH19C-6S-0.5SH(10)" FH19C-6S-0.5SH(10) 7450.36,2326.75 r0 bottom locked
J60 "FH19C-6S-0.5SH(10)" FH19C-6S-0.5SH(10) 1859.42,1576.75 r0 bottom
J61 "X6511WVS-06H-C60D48R2" X6511WVS-06H-C60D48R2 5796.79,4305.75 r0 bottom locked
J62 "X6511WVS-06H-C60D48R2" X6511WVS-06H-C60D48R2 9533.47,4310.38 r0 bottom locked
J63 "FH19C-6S-0.5SH(10)" FH19C-6S-0.5SH(10) 4460.73,2326.75 r0 bottom locked
J64 "FH19C-6S-0.5SH(10)" FH19C-6S-0.5SH(10) 8199.05,2325.75 r0 bottom locked
J65 "FH19C-6S-0.5SH(10)" FH19C-6S-0.5SH(10) 2607.36,1576.75 r0 bottom
J66 "X6511WVS-06H-C60D48R2" X6511WVS-06H-C60D48R2 2448.42,3559.38 r0 bottom locked
J67 "X6511WVS-06H-C60D48R2" X6511WVS-06H-C60D48R2 6188.1,3560.38 r0 bottom locked
J68 "FH19C-6S-0.5SH(10)" FH19C-6S-0.5SH(10) 1111.36,810.75 r0 bottom locked
J69 "FH19C-6S-0.5SH(10)" FH19C-6S-0.5SH(10) 8201.05,809.75 r0 bottom locked
J70 "FH19C-6S-0.5SH(10)" FH19C-6S-0.5SH(10) 1860.42,809.75 r0 bottom locked
J71 "FH19C-6S-0.5SH(10)" FH19C-6S-0.5SH(10) 10062.79,809.75 r0 bottom locked
J72 "FH19C-6S-0.5SH(10)" FH19C-6S-0.5SH(10) 2609.05,809.75 r0 bottom locked
J73 "FH19C-6S-0.5SH(10)" FH19C-6S-0.5SH(10) 9406.42,809.75 r0 bottom locked
J74 "FH19C-6S-0.5SH(10)" FH19C-6S-0.5SH(10) 7451.1,810.75 r0 bottom locked
J75 "FH34SRJ-26S-0.5SH(50)" FH34SRJ-26S-0.5SH(50) 3351.95,77.67 r0 bottom locked
J76 "X6511WVS-06H-C60D48R2" X6511WVS-06H-C60D48R2 2803.16,4311.46 r0 bottom locked
J77 "X6511WVS-06H-C60D48R2" X6511WVS-06H-C60D48R2 6543.79,4305.75 r0 bottom locked
J78 "X6511WVS-06H-C60D48R2" X6511WVS-06H-C60D48R2 10281.79,4309.38 r0 bottom locked
J79 "X6511WVS-06H-C60D48R2" X6511WVS-06H-C60D48R2 3197.1,3559.38 r0 bottom locked
J80 "X6511WVS-06H-C60D48R2" X6511WVS-06H-C60D48R2 6937.79,3560.38 r0 bottom locked
J81 "X6511WVS-06H-C60D48R2" X6511WVS-06H-C60D48R2 3550.73,4311.46 r0 bottom locked
J82 "X6511WVS-06H-C60D48R2" X6511WVS-06H-C60D48R2 7285.79,4305.75 r0 bottom locked
J83 "X6511WVS-06H-C60D48R2" X6511WVS-06H-C60D48R2 203.1,3559.38 r0 bottom locked
J84 "X6511WVS-06H-C60D48R2" X6511WVS-06H-C60D48R2 3946.1,3559.38 r0 bottom locked
J85 "X6511WVS-06H-C60D48R2" X6511WVS-06H-C60D48R2 7685.1,3560.38 r0 bottom locked
J86 "X6511WVS-06H-C60D48R2" X6511WVS-06H-C60D48R2 4298.79,4305.75 r0 bottom locked
J87 "X6511WVS-06H-C60D48R2" X6511WVS-06H-C60D48R2 8038.79,4305.75 r0 bottom locked
J88 "X6511WVS-06H-C60D48R2" X6511WVS-06H-C60D48R2 950.79,3554.75 r0 bottom locked
J89 "X6511WVS-06H-C60D48R2" X6511WVS-06H-C60D48R2 4693.47,3559.38 r0 bottom locked
J90 "X6511WVS-06H-C60D48R2" X6511WVS-06H-C60D48R2 8434.1,3559.38 r0 bottom locked
J91 "X6511WVS-06H-C60D48R2" X6511WVS-06H-C60D48R2 9181.1,3559.38 r0 bottom locked
J92 "X6511WVS-06H-C60D48R2" X6511WVS-06H-C60D48R2 3371.1,2810.38 r0 bottom locked
J93 "X6511WVS-06H-C60D48R2" X6511WVS-06H-C60D48R2 7114.16,2811.38 r0 bottom locked
J94 "X6511WVS-06H-C60D48R2" X6511WVS-06H-C60D48R2 950.73,548.38 r0 bottom locked
J95 "X6511WVS-06H-C60D48R2" X6511WVS-06H-C60D48R2 8019.42,548.38 r0 bottom locked
J96 "X6511WVS-06H-C60D48R2" X6511WVS-06H-C60D48R2 301.73,2811.38 r0 bottom locked
J97 "X6511WVS-06H-C60D48R2" X6511WVS-06H-C60D48R2 4121.1,2812.38 r0 bottom locked
J98 "X6511WVS-06H-C60D48R2" X6511WVS-06H-C60D48R2 7862.16,2810.38 r0 bottom locked
J99 "X6511WVS-06H-C60D48R2" X6511WVS-06H-C60D48R2 1699.79,547.38 r0 bottom locked
J100 "X6511WVS-06H-C60D48R2" X6511WVS-06H-C60D48R2 9903.79,548.38 r0 bottom locked
J101 "X6511WVS-06H-C60D48R2" X6511WVS-06H-C60D48R2 1127.79,2811.38 r0 bottom locked
J102 "X6511WVS-06H-C60D48R2" X6511WVS-06H-C60D48R2 4869.79,2811.38 r0 bottom locked
J103 "X6511WVS-06H-C60D48R2" X6511WVS-06H-C60D48R2 8609.47,2811.38 r0 bottom locked
J104 "X6511WVS-06H-C60D48R2" X6511WVS-06H-C60D48R2 2448.42,547.38 r0 bottom locked
J105 "X6511WVS-06H-C60D48R2" X6511WVS-06H-C60D48R2 9245.79,548.38 r0 bottom locked
J106 "X6511WVS-06H-C60D48R2" X6511WVS-06H-C60D48R2 1877.42,2811.38 r0 bottom locked
J107 "X6511WVS-06H-C60D48R2" X6511WVS-06H-C60D48R2 5611.79,2808.38 r0 bottom locked
J108 "X6511WVS-06H-C60D48R2" X6511WVS-06H-C60D48R2 9356.79,2811.38 r0 bottom locked
J109 "X6511WVS-06H-C60D48R2" X6511WVS-06H-C60D48R2 7364.47,548.38 r0 bottom locked
J110 "X6511WVS-06H-C60D48R2" X6511WVS-06H-C60D48R2 2625.1,2811.38 r0 bottom locked
J111 "X6511WVS-06H-C60D48R2" X6511WVS-06H-C60D48R2 6366.1,2811.38 r0 bottom locked
J112 "X6511WVS-06H-C60D48R2" X6511WVS-06H-C60D48R2 400.42,2063.38 r0 bottom locked
J113 "FH19C-6S-0.5SH(10)" FH19C-6S-0.5SH(10) 3355.73,1578.75 r0 bottom
J114 "FH19C-6S-0.5SH(10)" FH19C-6S-0.5SH(10) 7095.73,1579.75 r0 bottom
J115 "X6511WVS-06H-C60D48R2" X6511WVS-06H-C60D48R2 3215.1,1316.38 r0 bottom locked
J116 "X6511WVS-06H-C60D48R2" X6511WVS-06H-C60D48R2 6957.1,1317.38 r0 bottom locked
J117 "FH19C-6S-0.5SH(10)" FH19C-6S-0.5SH(10) 4103.73,1579.75 r0 bottom
J118 "FH19C-6S-0.5SH(10)" FH19C-6S-0.5SH(10) 7843.1,1578.75 r0 bottom
J119 "X6511WVS-06H-C60D48R2" X6511WVS-06H-C60D48R2 3963.1,1317.38 r0 bottom locked
J120 "X6511WVS-06H-C60D48R2" X6511WVS-06H-C60D48R2 7701.47,1316.38 r0 bottom locked
J121 "FH19C-6S-0.5SH(10)" FH19C-6S-0.5SH(10) 4852.05,1578.75 r0 bottom
J122 "FH19C-6S-0.5SH(10)" FH19C-6S-0.5SH(10) 8590.42,1577.75 r0 bottom
J123 "X6511WVS-06H-C60D48R2" X6511WVS-06H-C60D48R2 4710.42,1316.38 r0 bottom locked
J124 "X6511WVS-06H-C60D48R2" X6511WVS-06H-C60D48R2 8450.79,1315.38 r0 bottom locked
J125 "FH19C-6S-0.5SH(10)" FH19C-6S-0.5SH(10) 5598.73,1578.75 r0 bottom
J126 "FH19C-6S-0.5SH(10)" FH19C-6S-0.5SH(10) 9912.36,1577.75 r0 bottom locked
J127 "X6511WVS-06H-C60D48R2" X6511WVS-06H-C60D48R2 9751.73,1315.38 r0 bottom locked
J128 "X6511WVS-06H-C60D48R2" X6511WVS-06H-C60D48R2 5458.1,1316.38 r0 bottom locked
J129 "FH19C-6S-0.5SH(10)" FH19C-6S-0.5SH(10) 6349.05,1578.75 r0 bottom
J130 "FH19C-6S-0.5SH(10)" FH19C-6S-0.5SH(10) 364.42,810.75 r0 bottom locked
J131 "X6511WVS-06H-C60D48R2" X6511WVS-06H-C60D48R2 6207.42,1316.38 r0 bottom locked
J132 "X6511WVS-06H-C60D48R2" X6511WVS-06H-C60D48R2 203.79,548.38 r0 bottom locked
J133 "X6511WVS-06H-C60D48R2" X6511WVS-06H-C60D48R2 1307.1,2063.38 r0 bottom locked
J134 "X6511WVS-06H-C60D48R2" X6511WVS-06H-C60D48R2 5047.42,2063.38 r0 bottom locked
J135 "X6511WVS-06H-C60D48R2" X6511WVS-06H-C60D48R2 8788.73,2064.38 r0 bottom locked
J136 "X6511WVS-06H-C60D48R2" X6511WVS-06H-C60D48R2 2054.42,2063.38 r0 bottom locked
J137 "X6511WVS-06H-C60D48R2" X6511WVS-06H-C60D48R2 5796.79,2064.38 r0 bottom locked
J138 "X6511WVS-06H-C60D48R2" X6511WVS-06H-C60D48R2 9536.79,2063.38 r0 bottom locked
J139 "X6511WVS-06H-C60D48R2" X6511WVS-06H-C60D48R2 2804.79,2062.38 r0 bottom locked
J140 "X6511WVS-06H-C60D48R2" X6511WVS-06H-C60D48R2 6544.73,2064.38 r0 bottom locked
J141 "X6511WVS-06H-C60D48R2" X6511WVS-06H-C60D48R2 597.1,1314.38 r0 bottom locked
J142 "X6511WVS-06H-C60D48R2" X6511WVS-06H-C60D48R2 3552.79,2063.38 r0 bottom locked
J143 "X6511WVS-06H-C60D48R2" X6511WVS-06H-C60D48R2 7292.73,2064.38 r0 bottom locked
J144 "X6511WVS-06H-C60D48R2" X6511WVS-06H-C60D48R2 1719.79,1313.75 r0 bottom locked
J145 "X6511WVS-06H-C60D48R2" X6511WVS-06H-C60D48R2 4299.79,2069.46 r0 bottom locked
J146 "X6511WVS-06H-C60D48R2" X6511WVS-06H-C60D48R2 8040.42,2063.38 r0 bottom locked
J147 "X6511WVS-06H-C60D48R2" X6511WVS-06H-C60D48R2 2468.73,1315.38 r0 bottom locked
P1 "Test Point" "TEST POINT"#1 -84.75,3990.46 r90 top locked
P2 "Test Point" "TEST POINT"#1 -84.75,3853.31 r90 top locked
P3 "Test Point" "TEST POINT"#1 -84.75,3716.16 r90 top locked
P4 "Test Point" "TEST POINT"#1 -84.75,3579.01 r90 top locked
P5 "Test Point" "TEST POINT"#1 -84.75,3441.86 r90 top locked
P6 "Test Point" "TEST POINT"#1 -84.75,3304.71 r90 top locked
P7 "Test Point" "TEST POINT"#1 -84.75,3167.56 r90 top locked
P8 "Test Point" "TEST POINT"#1 -84.75,3030.41 r90 top locked
P9 "Test Point" "TEST POINT"#1 -84.75,2893.26 r90 top locked
P10 "Test Point" "TEST POINT"#1 -84.75,2756.11 r90 top locked
P11 "Test Point" "TEST POINT"#1 -84.75,2618.96 r90 top locked
P12 "Test Point" "TEST POINT"#1 -84.75,2481.81 r90 top locked
P13 "Test Point" "TEST POINT"#1 -84.75,2344.66 r90 top locked
P14 "Test Point" "TEST POINT"#1 -84.75,2207.51 r90 top locked
P15 "Test Point" "TEST POINT"#1 -84.75,2070.36 r90 top locked
P16 "Test Point" "TEST POINT"#1 -84.75,1933.21 r90 top locked
P17 "Test Point" "TEST POINT"#1 -84.75,1796.06 r90 top locked
P18 "Test Point" "TEST POINT"#1 -84.75,1658.91 r90 top locked
P19 "Test Point" "TEST POINT"#1 -84.75,1521.76 r90 top locked
P20 "Test Point" "TEST POINT"#1 -84.75,1384.61 r90 top locked
P21 "Test Point" "TEST POINT"#2 -70.21,1247.46 r90 top locked
SW1 "Graphite Contact" "Graphite Contact" 3516.48,3076 r0 top
SW2 "Graphite Contact" "Graphite Contact" 4292,3076 r0 top
SW3 "Graphite Contact" "Graphite Contact" 5012.48,3076 r0 top
SW4 "Graphite Contact" "Graphite Contact" 5760.79,3076 r0 top
SW5 "Graphite Contact" "Graphite Contact" 6509.79,3076 r0 top
SW6 "Graphite Contact" "Graphite Contact" 7256.79,3076 r0 top
SW7 "Graphite Contact" "Graphite Contact" 8005.79,3076 r0 top
SW8 "Graphite Contact" "Graphite Contact" 8753.79,3076 r0 top
SW9 "Graphite Contact" "Graphite Contact" 1871.48,3823 r0 top
SW10 "Graphite Contact" "Graphite Contact" 2611,3823 r0 top
SW11 "Graphite Contact" "Graphite Contact" 3359.48,3823 r0 top
SW12 "Graphite Contact" "Graphite Contact" 4107.48,3823 r0 top
SW13 "Graphite Contact" "Graphite Contact" 4855.48,3823 r0 top
SW14 "Graphite Contact" "Graphite Contact" 5604,3823 r0 top
SW15 "Graphite Contact" "Graphite Contact" 6352,3823 r0 top
SW16 "Graphite Contact" "Graphite Contact" 7098.48,3823 r0 top
SW17 "Graphite Contact" "Graphite Contact" 5209.42,2320 r0 top
SW18 "Graphite Contact" "Graphite Contact" 5958,2320 r0 top
SW19 "Graphite Contact" "Graphite Contact" 6706,2320 r0 top
SW20 "Graphite Contact" "Graphite Contact" 7453.48,2323 r0 top
SW21 "Graphite Contact" "Graphite Contact" 8202.05,2320 r0 top
SW22 "Graphite Contact" "Graphite Contact" 8962.48,2326 r0 top
SW23 "Graphite Contact" "Graphite Contact" 9698.48,2320 r0 top
SW24 "Graphite Contact" "Graphite Contact" 741,1572 r0 top
SW25 "Graphite Contact" "Graphite Contact" 7847.48,1571 r0 top
SW26 "Graphite Contact" "Graphite Contact" 8598.48,1570 r0 top
SW27 "Graphite Contact" "Graphite Contact" 9896,1570 r0 top
SW28 "Graphite Contact" "Graphite Contact" 367,825 r0 top
SW29 "Graphite Contact" "Graphite Contact" 1113.48,825 r0 top
SW30 "Graphite Contact" "Graphite Contact" 1863.48,825 r0 top
SW31 "Graphite Contact" "Graphite Contact" 2610.48,825 r0 top
SW32 "Graphite Contact" "Graphite Contact" 3654.48,825 r0 top
SW33 "Graphite Contact" "Graphite Contact" 367.48,4564 r0 top
SW34 "Graphite Contact" "Graphite Contact" 1469.48,4564 r0 top
SW35 "Graphite Contact" "Graphite Contact" 2217.48,4564 r0 top
SW36 "Graphite Contact" "Graphite Contact" 2966,4564 r0 top
SW37 "Graphite Contact" "Graphite Contact" 3710.79,4571.75 r0 top
SW38 "Graphite Contact" "Graphite Contact" 4469,4571.75 r0 top
SW39 "Graphite Contact" "Graphite Contact" 5209,4571.75 r0 top
SW40 "Graphite Contact" "Graphite Contact" 5957,4571.75 r0 top
SW41 "Graphite Contact" "Graphite Contact" 9494.48,3076 r0 top
SW42 "Graphite Contact" "Graphite Contact" 10443.48,2694 r0 top locked
SW43 "Graphite Contact" "Graphite Contact" 545,2320 r0 top
SW44 "Graphite Contact" "Graphite Contact" 1468.1,2320 r0 top
SW45 "Graphite Contact" "Graphite Contact" 2218,2320 r0 top
SW46 "Graphite Contact" "Graphite Contact" 2965.79,2320 r0 top
SW47 "Graphite Contact" "Graphite Contact" 3712.79,2320 r0 top
SW48 "Graphite Contact" "Graphite Contact" 4461.79,2320 r0 top
SW49 "Graphite Contact" "Graphite Contact" 7845.48,3823 r0 top
SW50 "Graphite Contact" "Graphite Contact" 8595.48,3823 r0 top
SW51 "Graphite Contact" "Graphite Contact" 9335,3823 r0 top
SW52 "Graphite Contact" "Graphite Contact" 10268.48,3823 r0 top
SW53 "Graphite Contact" "Graphite Contact" 446,3076 r0 top
SW54 "Graphite Contact" "Graphite Contact" 1273,3076 r0 top
SW55 "Graphite Contact" "Graphite Contact" 2020.53,3076 r0 top
SW56 "Graphite Contact" "Graphite Contact" 2768.48,3076 r0 top
SW57 "Graphite Contact" "Graphite Contact" 1863,1572 r0 top
SW58 "Graphite Contact" "Graphite Contact" 2611.48,1572 r0 top
SW59 "Graphite Contact" "Graphite Contact" 3359.48,1572 r0 top
SW60 "Graphite Contact" "Graphite Contact" 4107,1572 r0 top
SW61 "Graphite Contact" "Graphite Contact" 4855.48,1572 r0 top
SW62 "Graphite Contact" "Graphite Contact" 5603,1572 r0 top
SW63 "Graphite Contact" "Graphite Contact" 6351.48,1572 r0 top
SW64 "Graphite Contact" "Graphite Contact" 7099.48,1572 r0 top
SW65 "Graphite Contact" "Graphite Contact" 6411.48,825 r0 top
SW66 "Graphite Contact" "Graphite Contact" 7464,831 r0 top
SW67 "Graphite Contact" "Graphite Contact" 8202,831 r0 top
SW68 "Graphite Contact" "Graphite Contact" 8950,647 r0 top
SW69 "Graphite Contact" "Graphite Contact" 9698,1001 r0 top
SW70 "Graphite Contact" "Graphite Contact" 9698,647 r0 top
SW71 "Graphite Contact" "Graphite Contact" 10446,647 r0 top
SW73 "Graphite Contact" "Graphite Contact" 6705.48,4571.75 r0 top
SW74 "Graphite Contact" "Graphite Contact" 7454,4571.75 r0 top
SW75 "Graphite Contact" "Graphite Contact" 8202.48,4571.75 r0 top
SW76 "Graphite Contact" "Graphite Contact" 8950.48,4569.75 r0 top
SW77 "Graphite Contact" "Graphite Contact" 9698,4569.75 r0 top
SW78 "Graphite Contact" "Graphite Contact" 10446.48,4569.75 r0 top
SW79 "Graphite Contact" "Graphite Contact" 367,3823 r0 top
SW80 "Graphite Contact" "Graphite Contact" 1114.48,3823 r0 top

## Footprints (in the part's own frame and the unit in brackets; to place one, negate y for a bottom-side part, rotate by r counter-clockwise, add the part's x,y. Pads: shape width x height; smd on the part's side, far side on the other; paste and mask are expansions set on the pad)
046288080000846+ [mm]
  rect 0.3x1.3 smd: 1(-19.75,2.825) 2(-19.25,2.825) 3(-18.75,2.825) 4(-18.25,2.825) 5(-17.75,2.825) 6(-17.25,2.825) 7(-16.75,2.825) 8(-16.25,2.825) 9(-15.75,2.825) 10(-15.25,2.825) 11(-14.75,2.825) 12(-14.25,2.825) 13(-13.75,2.825) 14(-13.25,2.825) 15(-12.75,2.825) 16(-12.25,2.825) 17(-11.75,2.825) 18(-11.25,2.825) 19(-10.75,2.825) 20(-10.25,2.825) 21(-9.75,2.825) 22(-9.25,2.825) 23(-8.75,2.825) 24(-8.25,2.825) 25(-7.75,2.825) 26(-7.25,2.825) 27(-6.75,2.825) 28(-6.25,2.825) 29(-5.75,2.825) 30(-5.25,2.825) 31(-4.75,2.825) 32(-4.25,2.825) 33(-3.75,2.825) 34(-3.25,2.825) 35(-2.75,2.825) 36(-2.25,2.825) 37(-1.75,2.825) 38(-1.25,2.825) 39(-0.75,2.825) 40(-0.25,2.825) 41(0.25,2.825) 42(0.75,2.825) 43(1.25,2.825) 44(1.75,2.825) 45(2.25,2.825) 46(2.75,2.825) 47(3.25,2.825) 48(3.75,2.825) 49(4.25,2.825) 50(4.75,2.825) 51(5.25,2.825) 52(5.75,2.825) 53(6.25,2.825) 54(6.75,2.825) 55(7.25,2.825) 56(7.75,2.825) 57(8.25,2.825) 58(8.75,2.825) 59(9.25,2.825) 60(9.75,2.825) 61(10.25,2.825) 62(10.75,2.825) 63(11.25,2.825) 64(11.75,2.825) 65(12.25,2.825) 66(12.75,2.825) 67(13.25,2.825) 68(13.75,2.825) 69(14.25,2.825) 70(14.75,2.825) 71(15.25,2.825) 72(15.75,2.825) 73(16.25,2.825) 74(16.75,2.825) 75(17.25,2.825) 76(17.75,2.825) 77(18.25,2.825) 78(18.75,2.825) 79(19.25,2.825) 80(19.75,2.825)
  rect 1.8x2.2 smd: MP1(-21.9,-2.825) MP2(21.9,-2.825)
  silkscreen extent -22.22,-4.11 22.23,3.84, body extent -22.1,-3.43 22.1,2.97, height 2.1
FH19C-6S-0.5SH(10) [mm] "Clamshell 0.5mm Bottom Contact Surface Mount 6 SMD,P=0.5mm FFC/FPC Connectors ROHS"
  rect 0.35x2.5 smd: 1(0,0) 2(0.5,0) 3(1,0) 4(1.5,0) 5(2,0) 6(2.5,0)
  silkscreen extent -1.24,-2.34 3.78,1.51, body extent -1.24,-2.38 3.76,1.11, height 0.9
FH34SRJ-26S-0.5SH(50) [mm] "CONN FFC FPC 26POS 0.50MM R/A"
  rect 0.3x0.8 smd: 1(6.25,1.25) 2(5.75,1.25) 3(5.25,1.25) 4(4.75,1.25) 5(4.25,1.25) 6(3.75,1.25) 7(3.25,1.25) 8(2.75,1.25) 9(2.25,1.25) 10(1.75,1.25) 11(1.25,1.25) 12(0.75,1.25) 13(0.25,1.25) 14(-0.25,1.25) 15(-0.75,1.25) 16(-1.25,1.25) 17(-1.75,1.25) 18(-2.25,1.25) 19(-2.75,1.25) 20(-3.25,1.25) 21(-3.75,1.25) 22(-4.25,1.25) 23(-4.75,1.25) 24(-5.25,1.25) 25(-5.75,1.25) 26(-6.25,1.25)
  rect 0.4x0.8 smd: MP1(-7.25,-1.25) MP2(7.25,-1.25)
  silkscreen extent -7.49,-1.91 7.49,1.94, body extent -7.5,-1.9 7.5,1.9, height 1
"Graphite Contact" [mm]
  rrect50% 1.85x4.2 smd: 1(0,0) 2(2.35,0)
  silkscreen extent -1.04,-2.21 3.39,2.21
"TEST POINT"#1 [mm]
  round 2.5 hole 1.5: 1(0,0)
  silkscreen extent -1.17,-1.17 1.17,1.16
"TEST POINT"#2 [mm]
  round 2.5 hole 1.5: 1(0,0.433)
  silkscreen extent -1.17,-1.17 1.17,1.16
X6511WVS-06H-C60D48R2 [mm] "250V 3A Brick nogging Square Pins 2.5mm 260? 6mm -40?~+105? 1 6 2.54mm Brass 1x6P SMD,P=2.54mm Pin Headers ROHS"
  rect 1.27x2.2 smd: 1(0,0) 2(2.54,-1.8) 3(5.08,0) 4(7.62,-1.8) 5(10.16,0) 6(12.7,-1.8)
  silkscreen extent -1.29,-1.8 13.97,1.45, body extent -1.24,-3.19 14,1.6

## Part data
J1 J2 J3 J5 J6 J7 J8 J9 J10 J11 J12 J13 J14 J15 J16 J17 J18 J19 J20 J21 J22 J23 J24 J25 J26 J27 J28 J29 J30 J31 J32 J33 J34 J35 J36 J37 J38 J39 J40 J41 J42 J43 J44 J48 J49 J50 J53 J54 J55 J58 J59 J60 J63 J64 J65 J68 J69 J70 J71 J72 J73 J74 J113 J114 J117 J118 J121 J122 J125 J126 J129 J130: "0.5mm Pitch, 0.9mm Height, No of Contact 4-50, FPC/FFC Connector, 0.5 A, -55 to 85 ℃, RoHS", Manufacturer=Hirose, Supplier Part Number 1=H125824CT-ND, Category="FFC / FPC", ComponentLink1Description=https://datasheet.ciiva.com/18563/ed-fh19cfh19sc-20140305-18563530.pdf?src-supplier=Digi-Key, ComponentLink1URL=https://datasheet.ciiva.com/18563/ed-fh19cfh19sc-20140305-18563530.pdf?src-supplier=Digi-Key, Manufacturer Part Number=FH19C-6S-0.5SH(10), Pricing 1="1=1.10000, 10=0.96900, 25=0.91200, 50=0.87400, 100=0.83600, 250=0.76000, 500=0.68400, 1000=0.60800, 2500=0.55100 (USD)", RoHS=Yes, Stock 1=1159, Supplier 1=Digi-Key
J4 J47: "0.5MM PITCH - 80 POS - RIGHT ANG", Manufacturer="Kyocera AVX", Package=Custom, ComponentLink1Description=LCSC, ComponentLink1URL=https://lcsc.com/product-detail/FFC-span-style-background-color-ff0-FPC-span-Connectors_Kyocera-046288080000846_C513346.html, Manufacturer Part No=046288080000846+
J45 J46 J51 J52 J56 J57 J61 J62 J66 J67 J76 J77 J78 J79 J80 J81 J82 J83 J84 J85 J86 J87 J88 J89 J90 J91 J92 J93 J94 J95 J96 J97 J98 J99 J100 J101 J102 J103 J104 J105 J106 J107 J108 J109 J110 J111 J112 J115 J116 J119 J120 J123 J124 J127 J128 J131 J132 J133 J134 J135 J136 J137 J138 J139 J140 J141 J142 J143 J144 J145 J146 J147: "6 POS 2.54mm SMD Header", Current Rating (Max)=3A, Manufacturer="XKB Connectivity", Voltage Rating (Max)=250V, Circluar Pins/Square Pins="Square Pins", ComponentLink1Description=LCSC, ComponentLink1URL=https://lcsc.com/product-detail/span-style-background-color-ff0-Pin-span-Headers_XKB-Connectivity-X6511WVS-06H-C60D48R2_C2883763.html, Insulation Height=2.5mm, Length of Mating Pin=6mm
J75: "CONN FFC FPC 26POS 0.50MM R/A", Manufacturer=Hirose, Manufacturer Part Number=FH34SRJ-8S-0.5SH(99), Supplier Part Number 1=1362475, Category="FFC / FPC", ComponentLink1Description=https://datasheet.ciiva.com/18561/ed-fh34s-20140305-18561974.pdf?src-supplier=Digi-Key, ComponentLink1URL=https://datasheet.ciiva.com/18561/ed-fh34s-20140305-18561974.pdf?src-supplier=Digi-Key, Pricing 1="5=2.79500, 25=2.28400, 100=2.17100, 250=1.96400 (USD)", RoHS=Yes, Stock 1=190, Supplier 1=RSComponents
P1 P2 P3 P4 P5 P6 P7 P8 P9 P10 P11 P12 P13 P14 P15 P16 P17 P18 P19 P20 P21: library part "TEST POINT", "Test Point ON"
SW1 SW2 SW3 SW4 SW5 SW6 SW7 SW8 SW9 SW10 SW11 SW12 SW13 SW14 SW15 SW16 SW17 SW18 SW19 SW20 SW21 SW22 SW23 SW24 SW25 SW26 SW27 SW28 SW29 SW30 SW31 SW32 SW33 SW34 SW35 SW36 SW37 SW38 SW39 SW40 SW41 SW42 SW43 SW44 SW45 SW46 SW47 SW48 SW49 SW50 SW51 SW52 SW53 SW54 SW55 SW56 SW57 SW58 SW59 SW60 SW61 SW62 SW63 SW64 SW65 SW66 SW67 SW68 SW69 SW70 SW71 SW73 SW74 SW75 SW76 SW77 SW78 SW79 SW80: "Push Button for Graphite Contact"

## Free pads (board coordinates)
  round 86.61 hole 86.61 unplated: MH(790.73,3459.03) MH(1886.8,4207.06) MH(1889.55,2679.5) MH(2283.25,1199.18) MH(3034.83,3459.03) MH(3779.32,1931.47) MH(4132.07,4207.06) MH(5275.38,1214.93) MH(5428.92,2710.99) MH(6023.41,1931.47) MH(6376.17,4207.06) MH(6774.99,3459.03) MH(7673.41,2710.99) MH(9019.08,1931.47) MH(9767.11,3459.03) MH(9917.51,2710.99)
  round 78.74 hole 78.74 unplated: MH(8620.26,4207.06)
  round 118.11 hole 98.43: MH1(-230.45,3816.6) MH2(-230.45,1572.51) MH3(11362.3,3817.29) MH4(11362.3,1573.2)

## Via types
v1: diameter 15.75, hole 7.87, Top Layer to Bottom Layer, tented both sides, 655 vias
v2: diameter 23.62, hole 11.81, Top Layer to Bottom Layer, 2 vias

## Nets (pads, with @x,y where several pads share a name; then routed paths per layer and width w, separated by ;. In a path a pad name is that pad's centre, name@x,y a point inside that pad or via, vN(x,y) a via of type N, cw(c..) or ccw(c..) an arc to the next point about the centre after c; other vN are vias at no path point)
COl_1: J75.1 P1.1 SW1.2 SW9.2 SW17.2 SW25.2 SW33.2 | length 8497.3
  Top Layer w8: SW33.2@460,4564 462,4562 v1(462,4458) ; v1(3146,3043) 3146,2975 3424.73,2696.27 v1(3424.73,2570.46)
  Bottom Layer w8: P1.1@-84.75,3990.46 -26.6,3932.31 844.69,3932.31 ; v1(462,4458) 688,4458 763,4383 763,4014 844.69,3932.31 ; v1(3146,3043) 3146,3852.25 3065.94,3932.31 844.69,3932.31 ; v1(3424.73,2570.46) 3424.73,2038.27 3502,1961 3629.25,1961 3839.79,1750.46 3839.79,1166.46 3598.01,924.68 J75.1@3598.01,28.46
Col_1.COL_2: J75.2 P2.1 SW2.2 SW10.2 SW18.2 SW26.2 SW34.2 | length 9760.7
  Top Layer w8: v1(1562,3912) v1(1562,3951) ; v1(1562,4414) SW34.2@1562,4564 ; SW10.2@2704,3823.48 v1(2704,3912) ; v1(3109,3043) 3109,2984.21 3405.05,2688.16 v1(3405.05,2586.46) ; v1(3109,3427) v1(3774,3427)
  Top Layer w12: v1(4061,3269) 4122,3208 4358,3208 4384.52,3181.48 SW2.2@4384.52,3076
  Bottom Layer w8: P2.1@-84.75,3853.31 -26.06,3912 v1(1562,3912) v1(2704,3912) 3049.25,3912 3109,3852.25 v1(3109,3427) v1(3109,3043) ; v1(1562,3951) v1(1562,4414) ; v1(3405.05,2586.46) 3405.05,2033.95 3494,1945 3624.03,1945 3820.1,1748.93 3820.1,1174.61 3578.32,932.83 J75.2@3578.32,28.46 ; v1(3774,3427) 3932,3269 v1(4061,3269)
Col_1.COL_3: J75.3 P3.1 SW3.2 SW11.2 SW19.2 SW27.2 SW35.2 | length 10473.5
  Top Layer w8: v1(2332.96,3856) v1@2333.46,3856.5 ; v1@2332.96,3856.5 v1@2332.96,3973.5 ; v1@2333.46,3973.5 v1@2333.96,3974 ; v1(2558,3186.12) 2885.88,3186.12 3385.36,2686.64 v1(3385.36,2570.46)
  Top Layer w12: v1(1949.96,4493) 1950,4590 2038,4678 2296.68,4678 2310,4664.68 SW35.2@2310,4564 SW35.2@2310,4517 ; v1(3450.8,3975.54) 3450.8,3886.21 SW11.2@3452,3885.01
  Bottom Layer w8: P3.1@-84.75,3716.16 25.25,3716.16 149.79,3591.61 149.79,3387.21 294.54,3242.46 2501.66,3242.46 v1(2558,3186.12) 2558,3331 2333,3556 v1(2332.96,3856) ; v1(3385.36,2570.46) 3385.36,2030.85 3488.21,1928 3619.82,1928 3800.42,1747.4 3800.42,1182.77 3558.64,940.99 J75.3@3558.64,28.46
  Bottom Layer w12: v1(1949.96,4493) 1949.96,4298.04 2274,3974 v1(2332.96,3974) 2333.68,3974.72 2336.33,3974.72 2337.15,3975.54 v1(3450.8,3975.54)
Col_1.COL_4: J75.4 P4.1 SW4.2 SW12.2 SW20.2 SW28.2 SW36.2 | length 9648.5
  Top Layer w8: v1(2597,3118) 2598,3118 2778,2938 3112,2938 3365.68,2684.32 v1(3365.68,2586.46)
  Top Layer w12: v1(164.96,3337) 165,1006 206,965 426,965 459.52,931.48 SW28.2@459.52,825
  Bottom Layer w8: P4.1@-84.75,3579.01 25.25,3579.01 127.25,3477 127.25,3375 275.79,3226.46 2488.54,3226.46 v1(2597,3118) ; v1(3365.68,2586.46) 3365.68,2029.32 3484,1911 3615.25,1911 3780.73,1745.51 3780.73,1190.92 3538.95,949.14 J75.4@3538.95,28.46
Col_1.COL_5: J75.5 P5.1 SW5.2 SW13.2 SW21.2 SW29.2 SW37.2 | length 6747.3
  Top Layer w8: v1(2558,3130) 2662.69,3025.31 2765,2923 3102,2923 3345.99,2679.01 v1(3345.99,2570.46)
  Bottom Layer w8: P5.1@-84.75,3441.86 25.25,3441.86 257.65,3209.46 2478.54,3209.46 v1(2558,3130) ; v1(3345.99,2570.46) 3345.99,2026.01 3476,1896 3609.03,1896 3761.05,1743.99 3761.05,1199.07 3519.27,957.29 J75.5@3519.27,28.46
Col_1.COL_6: J75.6 P6.1 SW6.2 SW14.2 SW22.2 SW30.2 SW38.2 | length 6233.8
  Top Layer w8: v1(2437.79,3189.46) 2695.79,2931.46 2695.79,2060.46 2826.79,1929.46 v1(2933.79,1929.46)
  Bottom Layer w8: P6.1@-84.75,3304.71 122.29,3304.71 237.54,3189.46 v1(2437.79,3189.46) ; v1(2933.79,1929.46) 2933.79,1740.05 3169.58,1504.26 3169.58,1214.54 3499.58,884.54 J75.6@3499.58,28.46
Col_1.COL_7: J75.7 P7.1 SW7.2 SW15.2 SW23.2 SW31.2 SW39.2 | length 6139
  Top Layer w8: v1(2421.79,3170.46) 2680.79,2911.46 2680.79,2052.46 2827.79,1905.46 v1(2914.79,1905.46)
  Bottom Layer w8: P7.1@-84.75,3167.56 2413.41,3167.56 2414.83,3168.98 2420.31,3168.98 v1(2421.79,3170.46) ; v1(2914.79,1905.46) 2914.79,1737.84 3149.9,1502.73 3149.9,1206.38 3479.9,876.38 J75.7@3479.9,28.46
Col_1.COL_8: J75.8 P8.1 SW8.2 SW16.2 SW24.2 SW32.2 SW40.2 | length 6134.5
  Top Layer w8: v1(2403.79,3148.68) 2665.79,2886.68 2665.79,2043.46 2832.79,1876.46 v1(2895.79,1876.46)
  Bottom Layer w8: P8.1@-84.75,3030.41 116.41,3030.41 237.46,3151.46 2395.54,3151.46 2396.83,3150.17 2402.31,3150.17 v1(2403.79,3148.68) ; v1(2895.79,1876.46) 2895.79,1735.63 3130.21,1501.2 3130.21,1198.23 3460.21,868.23 J75.8@3460.21,28.46
Col_2.COL_9: J75.9 P9.1 SW41.2 SW49.2 SW57.2 SW65.2 SW73.2 | length 6468.5
  Top Layer w8: v1(1498.92,1851.33) 1569.58,1922 2220.79,1922 2458.83,1683.96 2464.15,1678.64 ccw(c2470.09,1684) 2464.45,1678.32 2466.79,1676 2470.09,1676 v1(2482,1676) 2888,1676 2899.64,1687.64 v1(2915.97,1687.64) ; SW57.2@1955.52,1572 1955.52,1625.52 2020,1690 v1(2396,1690)
  Bottom Layer w8: P9.1@-84.75,2893.26 167.99,2893.26 222,2839.25 222,2137.25 438.79,1920.46 1429.79,1920.46 v1(1498.92,1851.33) ; v1(2396,1690) 2467.89,1690 2481.89,1676 v1(2482,1676) ; v1(2915.97,1687.64) 3110.53,1493.07 3110.53,1190.07 3440.53,860.07 J75.9@3440.53,28.46